# Altium PCB DB30.PcbDoc (part 5 of 8)
Units mil, origin at the board's own origin, x right, y up, seen from the top; angles counter-clockwise.
Board outline 3236.22 x 4456.69 mil, 8 copper layers (Top Layer, MidLayer1, MidLayer2, GND-Layer5, MidLayer3, VCC, MidLayer4, Bottom Layer), stack 61.8 mil thick; 219 components, 472 nets, 1811 pads, 1561 vias.
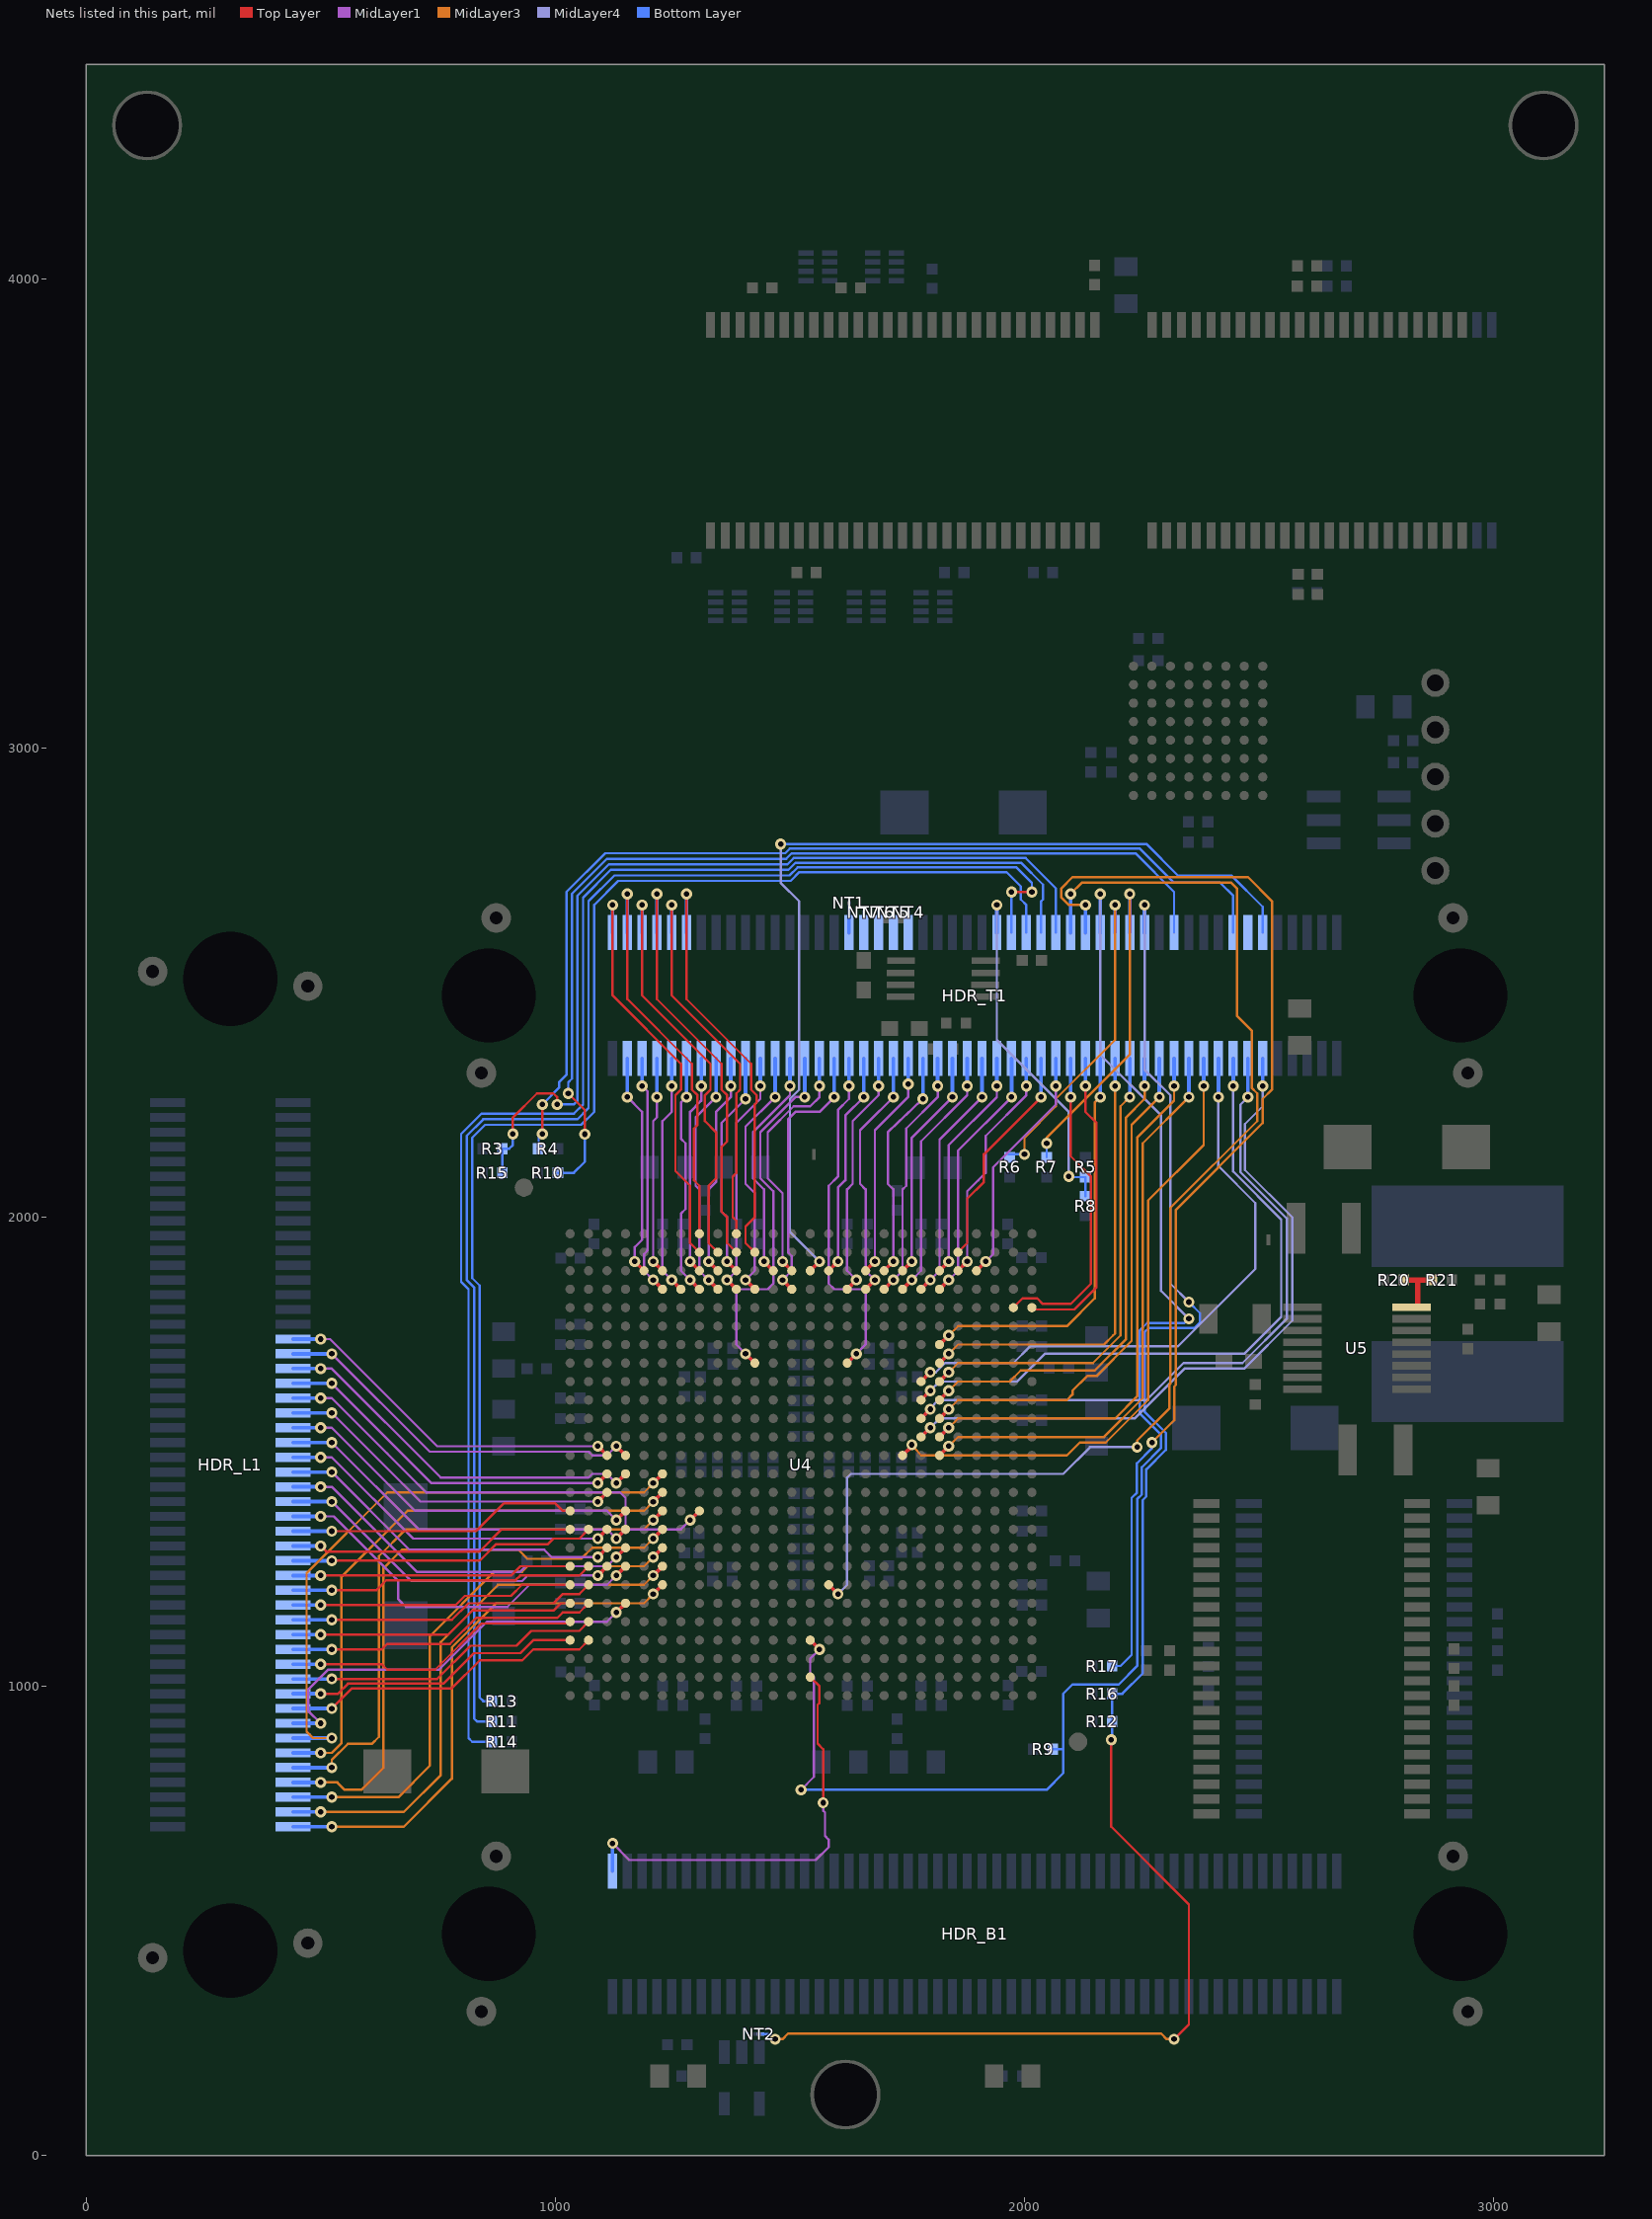
[diagram p11: the nets of this part, all layers, seen from the top]

## Via types
v1: diameter 23.62, hole 11.81, Top Layer to Bottom Layer, 944 vias
v2: diameter 23.62, hole 11.81, Top Layer to Bottom Layer, tented both sides, 477 vias
v3: diameter 27.56, hole 15.75, Top Layer to Bottom Layer, 139 vias
v4: diameter 23.62, hole 11.81, Top Layer to Bottom Layer, tented top, 1 vias

## Nets (pads, with @x,y where several pads share a name; then routed paths per layer and width w, separated by ;. In a path a pad name is that pad's centre, name@x,y a point inside that pad or via, vN(x,y) a via of type N, cw(c..) or ccw(c..) an arc to the next point about the centre after c; other vN are vias at no path point) (continued)
EXTEND_B16: HDR_L1.34 U4.N3 | length 772
  Top Layer w7.87: v1(1090.55,1511.81) U4.N3@1110.24,1492.13
  MidLayer1 w5: v2(500,1740.16) 519.68,1740.16 748.03,1511.81 956.69,1511.81 968.5,1511.81 v1(1090.55,1511.81)
  Bottom Layer w7.87: HDR_L1.34@440.94,1740.15 v2(500,1740.16)
EXTEND_B17: HDR_L1.36 U4.N4 | length 814.7
  Top Layer w7.87: v1(1129.92,1511.81) U4.N4@1149.61,1492.13
  MidLayer1 w5: v2(523.62,1708.66) 732.29,1500 956.69,1500 968.5,1500 1070.87,1500 1078.74,1492.13 1110.23,1492.13 v1(1129.92,1511.81)
  Bottom Layer w7.87: HDR_L1.36@440.94,1708.66 v2(523.62,1708.66)
EXTEND_B18: HDR_L1.38 U4.P4 | length 824.4
  Top Layer w7.87: v1(1129.92,1433.07) U4.P4@1149.61,1452.76
  MidLayer1 w5: v2(500,1677.17) 523.62,1677.17 755.91,1444.88 956.69,1444.88 968.5,1444.88 1070.87,1444.88 1078.74,1452.76 1110.23,1452.76 v1(1129.92,1433.07)
  Bottom Layer w7.87: HDR_L1.38@440.94,1677.16 v2(500,1677.17)
EXTEND_B19: HDR_L1.40 U4.P3 | length 765.5
  Top Layer w7.87: v1(1090.55,1433.07) U4.P3@1110.24,1452.76
  MidLayer1 w5: v2(523.62,1645.67) 736.22,1433.07 956.69,1433.07 968.5,1433.07 v1(1090.55,1433.07)
  Bottom Layer w7.87: HDR_L1.40@440.94,1645.67 v2(523.62,1645.67)
EXTEND_B20: HDR_L1.42 U4.T8 | length 1032.8
  Top Layer w7.87: v1(1287.4,1354.33) U4.T8@1307.09,1374.02
  MidLayer1 w5: v2(500,1614.17) 523.62,1614.17 641.73,1496.06 724.41,1413.39 956.69,1413.39 968.5,1413.39 1003.94,1413.39 1137.8,1413.39 1149.61,1401.57 1149.61,1342.52 1157.48,1334.65 1267.72,1334.65 v1(1287.4,1354.33)
  Bottom Layer w7.87: HDR_L1.42@440.94,1614.17 v2(500,1614.17)
EXTEND_B21: HDR_L1.44 U4.R3 | length 755.7
  Top Layer w7.87: v1(1090.55,1393.7) U4.R3@1110.24,1413.39
  MidLayer1 w5: v2(523.62,1582.68) 712.6,1393.7 956.69,1393.7 968.5,1393.7 v1(1090.55,1393.7)
  Bottom Layer w7.87: HDR_L1.44@440.94,1582.67 v2(523.62,1582.68)
EXTEND_B22: HDR_L1.46 U4.T4 | length 798.4
  Top Layer w7.87: v1(1129.92,1354.33) U4.T4@1149.61,1374.02
  MidLayer1 w5: v2(500,1551.18) 523.62,1551.18 700.79,1374.02 956.69,1374.02 968.5,1374.01 1110.24,1374.01 v1(1129.92,1354.33)
  Bottom Layer w7.87: HDR_L1.46@440.94,1551.18 v2(500,1551.18)
EXTEND_B23: HDR_L1.48 U4.U4 | length 801.6
  Top Layer w7.87: v1(1129.92,1314.96) U4.U4@1149.61,1334.65
  MidLayer1 w5: v2(523.62,1519.68) 708.66,1334.65 956.69,1334.65 968.5,1334.65 996.06,1334.65 1110.24,1334.64 v1(1129.92,1314.96)
  Bottom Layer w7.87: HDR_L1.48@440.94,1519.68 v2(523.62,1519.68)
EXTEND_B24: HDR_L1.50 U4.U3 | length 749.2
  Top Layer w7.87: v1(1090.55,1314.96) U4.U3@1110.24,1334.65
  MidLayer1 w5: v2(500,1488.19) 523.62,1488.19 696.85,1314.96 956.69,1314.96 968.5,1314.96 996.06,1314.96 v1(1090.55,1314.96)
  Bottom Layer w7.87: HDR_L1.50@440.94,1488.19 v2(500,1488.19)
EXTEND_B25: HDR_L1.52 U4.V3 | length 752.5
  Top Layer w7.87: v1(1090.55,1275.59) U4.V3@1110.24,1295.28
  MidLayer1 w5: v2(523.62,1456.69) 688.98,1291.34 956.69,1291.34 968.5,1291.34 976.38,1291.34 992.13,1275.59 v1(1090.55,1275.59)
  Bottom Layer w7.87: HDR_L1.52@440.94,1456.69 v2(523.62,1456.69)
EXTEND_B26: HDR_L1.54 U4.V4 | length 804.9
  Top Layer w7.87: v1(1129.92,1275.59) U4.V4@1149.61,1295.28
  MidLayer1 w5: v2(500,1425.2) 523.62,1425.2 704.72,1244.09 925.2,1244.09 937.01,1255.91 956.69,1255.91 968.5,1255.91 1110.24,1255.91 v1(1129.92,1275.59)
  Bottom Layer w7.87: HDR_L1.54@440.94,1425.19 v2(500,1425.2)
EXTEND_B27: HDR_L1.56 U4.W3 | length 752.5
  Top Layer w7.87: v1(1090.55,1236.22) U4.W3@1110.24,1255.91
  MidLayer1 w5: v2(523.62,1393.7) 692.91,1224.41 929.13,1224.41 940.94,1236.22 956.69,1236.22 968.5,1236.22 v1(1090.55,1236.22)
  Bottom Layer w7.87: HDR_L1.56@440.94,1393.7 v2(523.62,1393.7)
EXTEND_B28: HDR_L1.58 U4.W4 | length 961.4
  Top Layer w7.87: v1(1129.92,1236.22) U4.W4@1149.61,1255.91
  MidLayer1 w5: v2(500,1362.21) 527.56,1362.21 665.3,1224.46 665.3,1185.7 681.8,1169.2 897.55,1169.2 944.88,1216.54 956.69,1216.54 968.5,1216.54 1110.24,1216.54 ; 996.06,1216.54 1110.24,1216.54 ; v1(1129.92,1236.22) 1110.24,1216.54
  Bottom Layer w7.87: HDR_L1.58@440.94,1362.2 v2(500,1362.21)
EXTEND_B29: HDR_L1.60 U4.T1 | length 621.5
  Top Layer w5: v2(523.62,1330.71) 830.71,1330.71 889.76,1389.76 956.69,1389.76 968.5,1389.76 1000,1389.76 1015.75,1374.02 U4.T1@1031.5,1374.02
  Bottom Layer w7.87: HDR_L1.60@440.94,1330.71 v2(523.62,1330.71)
EXTEND_B30: HDR_L1.62 U4.U1 | length 615
  Top Layer w5: v2(500,1299.21) 511.81,1287.4 838.58,1287.4 885.83,1334.65 956.69,1334.65 968.5,1334.65 U4.U1@1031.5,1334.65
  Bottom Layer w7.87: HDR_L1.62@440.94,1299.21 v2(500,1299.21)
EXTEND_B31: HDR_L1.64 U4.U2 | length 657.6
  Top Layer w5: v2(523.62,1267.72) 838.58,1267.72 874.02,1303.15 956.69,1303.15 968.5,1303.15 984.25,1303.15 996.06,1314.96 1051.18,1314.96 U4.U2@1070.87,1334.65
  Bottom Layer w7.87: HDR_L1.64@440.94,1267.71 v2(523.62,1267.72)
EXTEND_B32: HDR_L1.66 U4.W1 | length 598.7
  Top Layer w5: v2(500,1236.22) 905.51,1236.22 925.2,1255.91 952.76,1255.91 968.5,1255.91 U4.W1@1031.5,1255.91
  Bottom Layer w7.87: HDR_L1.66@440.94,1236.22 v2(500,1236.22)
EXTEND_B33: HDR_L1.68 U4.W2 | length 651.1
  Top Layer w5: v2(523.62,1204.72) 618.4,1204.72 639.9,1226.22 915.2,1226.22 925.2,1236.22 952.76,1236.22 968.5,1236.22 1051.18,1236.22 U4.W2@1070.87,1255.91
  Bottom Layer w7.87: HDR_L1.68@440.94,1204.72 v2(523.62,1204.72)
EXTEND_B34: HDR_L1.70 U4.Y1 | length 608.5
  Top Layer w5: v2(500,1173.23) 787.4,1173.23 807.09,1192.91 905.51,1192.91 929.13,1216.54 952.76,1216.54 968.5,1216.54 U4.Y1@1031.5,1216.54
  Bottom Layer w7.87: HDR_L1.70@440.94,1173.23 v2(500,1173.23)
EXTEND_B35: HDR_L1.72 U4.Y2 | length 660.9
  Top Layer w5: v2(523.62,1141.73) 779.53,1141.73 814.96,1177.17 952.76,1177.17 968.5,1177.17 996.06,1177.17 1015.75,1196.85 1051.18,1196.85 U4.Y2@1070.87,1216.54
  Bottom Layer w7.87: HDR_L1.72@440.94,1141.73 v2(523.62,1141.73)
EXTEND_B36: HDR_L1.74 U4.AA1 | length 618.3
  Top Layer w5: v2(500,1110.24) 771.65,1110.24 822.83,1161.42 952.76,1161.42 968.5,1161.42 996.06,1161.42 1011.81,1177.17 U4.AA1@1031.5,1177.17
  Bottom Layer w7.87: HDR_L1.74@440.94,1110.23 v2(500,1110.24)
EXTEND_B37: HDR_L1.76 U4.AA2 | length 670.7
  Top Layer w5: v2(523.62,1078.74) 629.92,1078.74 641.73,1090.55 775.59,1090.55 830.71,1145.67 952.76,1145.67 968.5,1145.67 1003.94,1145.67 1015.75,1157.48 1051.18,1157.48 U4.AA2@1070.87,1177.17
  Bottom Layer w7.87: HDR_L1.76@440.94,1078.74 v2(523.62,1078.74)
EXTEND_B38: HDR_L1.78 U4.AB1 | length 637.8
  Top Layer w5: v2(500,1047.25) 629.92,1047.25 641.73,1035.43 744.09,1035.43 842.52,1133.86 952.76,1133.86 968.5,1133.86 1027.56,1133.86 U4.AB1@1031.5,1137.8
  Bottom Layer w7.87: HDR_L1.78@440.94,1047.24 v2(500,1047.25)
EXTEND_B39: HDR_L1.80 U4.AB2 | length 680.5
  Top Layer w5: v2(523.62,1015.75) 748.03,1015.75 818.9,1086.61 917.32,1086.61 948.82,1118.11 952.76,1118.11 968.5,1118.11 1011.81,1118.11 1051.18,1118.11 U4.AB2@1070.87,1137.8
  Bottom Layer w7.87: HDR_L1.80@440.94,1015.74 v2(523.62,1015.75)
EXTEND_B40: HDR_L1.82 U4.AC1 | length 637.8
  Top Layer w5: v2(500,984.25) 536.6,984.25 558.1,1005.75 761.65,1005.75 826.77,1070.87 925.2,1070.87 952.76,1098.43 968.5,1098.42 1011.81,1098.42 U4.AC1@1031.5,1098.43
  Bottom Layer w7.87: HDR_L1.82@440.94,984.25 v2(500,984.25)
EXTEND_B41: HDR_L1.84 U4.AC2 | length 690.3
  Top Layer w5: v2(523.62,952.75) 566.62,995.75 779.21,995.75 838.58,1055.12 929.13,1055.12 952.76,1078.74 968.5,1078.74 1051.18,1078.74 U4.AC2@1070.87,1098.43
  Bottom Layer w7.87: HDR_L1.84@440.94,952.75 v2(523.62,952.75)
EXTEND_B42: HDR_L1.86 U4.AA4 | length 894.4
  Top Layer w7.87: v1(1129.92,1157.48) U4.AA4@1149.61,1177.17
  MidLayer1 w5: v2(500,921.26) 473.3,947.96 473.3,992.9 516.16,1035.76 639.36,1035.76 752.29,1035.76 854.33,1137.8 952.76,1137.8 968.5,1137.8 1110.24,1137.8 v1(1129.92,1157.48)
  Bottom Layer w7.87: HDR_L1.86@440.94,921.26 v2(500,921.26)
EXTEND_B43: HDR_L1.88 U4.P6 | length 1326.2
  Top Layer w7.87: v1(1208.66,1433.07) U4.P6@1228.35,1452.76
  MidLayer3 w5: v2(523.62,889.76) 483.44,889.76 469.9,903.3 469.9,1241.5 641.79,1413.39 956.69,1413.39 968.5,1413.39 1188.98,1413.39 v1(1208.66,1433.07)
  Bottom Layer w7.87: HDR_L1.88@440.94,889.76 v2(523.62,889.76)
EXTEND_B44: HDR_L1.90 U4.R6 | length 1224.9
  Top Layer w7.87: v1(1208.66,1393.7) U4.R6@1228.35,1413.39
  MidLayer3 w5: v2(500,858.27) 523.62,858.27 543.8,878.45 543.8,1232.78 685.04,1374.02 956.69,1374.02 968.5,1374.02 1039.37,1374.02 1188.98,1374.02 v1(1208.66,1393.7)
  Bottom Layer w7.87: HDR_L1.90@440.94,858.26 v2(500,858.27)
EXTEND_B45: HDR_L1.92 U4.T6 | length 1249.2
  Top Layer w7.87: v1(1208.66,1354.33) U4.T6@1228.35,1374.02
  MidLayer3 w5: v2(523.62,826.77) 523.62,843.22 557.8,877.4 608.76,877.4 623.86,892.5 623.86,1277.4 681.1,1334.65 956.69,1334.65 968.5,1334.65 1188.98,1334.65 v1(1208.66,1354.33)
  Bottom Layer w7.87: HDR_L1.92@440.94,826.77 v2(523.62,826.77)
EXTEND_B46: HDR_L1.94 U4.U6 | length 1289.2
  Top Layer w7.87: v1(1208.66,1314.96) U4.U6@1228.35,1334.65
  MidLayer3 w5: v2(500,795.28) 535.43,795.28 551.18,779.53 586.61,779.53 633.86,826.77 633.86,1251.97 673.23,1291.34 921.26,1291.34 940.94,1271.65 956.69,1271.65 968.5,1271.65 1055.12,1271.65 1078.74,1295.28 1188.98,1295.28 v1(1208.66,1314.96)
  Bottom Layer w7.87: HDR_L1.94@440.94,795.27 v2(500,795.28)
EXTEND_B47: HDR_L1.96 U4.V6 | length 1169
  Top Layer w7.87: v1(1208.66,1275.59) U4.V6@1228.35,1295.28
  MidLayer3 w5: v2(523.62,763.78) 665.35,763.78 732.28,830.71 732.28,1106.3 870.08,1244.09 929.13,1244.09 940.94,1255.91 956.69,1255.91 968.5,1255.91 1188.97,1255.9 v1(1208.66,1275.59)
  Bottom Layer w7.87: HDR_L1.96@440.95,763.78 v2(523.62,763.78)
EXTEND_B48: HDR_L1.98 U4.W6 | length 1170.3
  Top Layer w7.87: v1(1208.66,1236.22) U4.W6@1228.35,1255.91
  MidLayer3 w5: v2(500,732.28) 677.16,732.28 755.91,811.02 755.91,1094.49 877.95,1216.54 956.69,1216.54 968.5,1216.54 1188.97,1216.53 v1(1208.66,1236.22)
  Bottom Layer w7.87: HDR_L1.98@440.94,732.28 v2(500,732.28)
EXTEND_B49: HDR_L1.100 U4.Y6 | length 1164.8
  Top Layer w7.87: v1(1208.66,1196.85) U4.Y6@1228.35,1216.54
  MidLayer3 w5: v2(523.62,700.79) 677.16,700.79 779.53,803.15 779.53,1082.68 874.02,1177.17 956.69,1177.17 968.5,1177.17 1188.97,1177.16 v1(1208.66,1196.85)
  Bottom Layer w7.87: HDR_L1.100@440.94,700.78 v2(523.62,700.79)
EXTEND_C0: HDR_T1.89 U4.M20 | length 1569.7
  Top Layer w7.87: U4.M20@1779.53,1531.5 v1(1799.21,1551.18)
  MidLayer4 w5: v1(1799.21,1551.18) 1818.9,1570.87 1988.19,1570.87 2078.74,1570.87 2094.49,1570.87 2234.77,1570.87 2341.07,1677.17 2468.5,1677.17 2570.87,1779.53 2570.87,1999.66 2470,2100.53 2470,2198.35 2507.87,2236.22 v2(2507.87,2279.53)
  Bottom Layer w7.87: v2(2507.87,2279.53) HDR_T1.89@2507.88,2338.58 v2(2507.87,2279.53)
EXTEND_C1: HDR_T1.87 U4.L20 | length 1471.8
  Top Layer w7.87: U4.L20@1779.53,1570.87 v1(1799.21,1590.55)
  MidLayer4 w5: v1(1799.21,1590.55) 1814.96,1610.24 1968.5,1610.24 2078.74,1610.24 2094.49,1610.24 2260,1610.24 2338.74,1688.98 2464.57,1688.98 2559.06,1783.46 2559.06,1997.33 2460,2096.39 2460,2239.53 v2(2476.38,2255.9)
  Bottom Layer w7.87: v2(2476.38,2255.9) HDR_T1.87@2476.38,2338.58
EXTEND_C2: HDR_T1.85 U4.K20 | length 1434.7
  Top Layer w7.87: U4.K20@1779.53,1610.24 v1(1799.21,1629.92)
  MidLayer4 w5: v1(1799.21,1629.92) 1818.9,1649.61 1984.25,1649.61 2043.31,1708.66 2074.8,1708.66 2090.55,1708.66 2468.5,1708.66 2547.24,1787.4 2547.24,1995 2444.88,2097.37 v2(2444.88,2279.53)
  Bottom Layer w7.87: v2(2444.88,2279.53) HDR_T1.85@2444.88,2338.58
EXTEND_C3: HDR_T1.83 U4.J20 | length 1293.5
  Top Layer w7.87: U4.J20@1779.53,1649.61 v1(1799.21,1669.29)
  MidLayer4 w5: v1(1799.21,1669.29) 1811.21,1669.29 1830.9,1688.98 1976.38,1688.98 2011.81,1724.41 2074.8,1724.41 2090.55,1724.41 2326.77,1724.41 2492.13,1889.76 2492.13,2030 2413.38,2108.74 v2(2413.38,2255.9)
  Bottom Layer w7.87: v2(2413.38,2255.9) HDR_T1.83@2413.39,2338.58
EXTEND_C4: HDR_T1.81 U4.N19 | length 1368.3
  Top Layer w7.87: U4.N19@1740.16,1492.13 v1@1759.84,1511.81
  MidLayer3 w5: v1(1759.84,1514.76) 1779.53,1492.13 2078.74,1492.13 2090.55,1492.13 2118.11,1519.69 2173.23,1519.69 2263.78,1610.24 2263.78,2035.43 2381.89,2153.54 v2(2381.89,2279.53)
  Bottom Layer w7.87: v2(2381.89,2279.53) HDR_T1.81@2381.89,2338.58
EXTEND_C5: HDR_T1.79 U4.N21 | length 1248.8
  Top Layer w7.87: U4.N21@1818.9,1492.13 v1(1838.58,1511.81)
  MidLayer3 w5: v1(1838.58,1511.81) 1858.27,1531.5 2078.74,1531.5 2090.55,1531.5 2169.29,1531.5 2251.97,1614.17 2251.97,2157.48 v2(2350.39,2255.9)
  Bottom Layer w7.87: v2(2350.39,2255.9) HDR_T1.79@2350.4,2338.58
EXTEND_C6: HDR_T1.77 U4.M21 | length 1210.2
  Top Layer w7.87: U4.M21@1818.9,1531.5 v1(1838.58,1551.18)
  MidLayer3 w5: v1(1838.58,1551.18) 1858.27,1570.87 2007.87,1570.87 2078.74,1570.87 2090.55,1570.87 2192.91,1570.87 2240.16,1618.11 2240.16,2169.29 2318.89,2248.03 v2(2318.89,2279.53)
  Bottom Layer w7.87: v2(2318.89,2279.53) HDR_T1.77@2318.9,2338.58
EXTEND_C7: HDR_T1.75 U4.L21 | length 1109.4
  Top Layer w7.87: U4.L21@1818.9,1570.87 v1(1838.58,1590.55)
  MidLayer3 w5: v1(1838.58,1590.55) 1858.27,1610.24 2078.74,1610.24 2090.55,1610.24 2102.36,1622.05 2102.36,1629.92 2133.86,1661.42 2153.54,1661.42 2228.35,1736.22 2228.35,2196.85 v2(2287.4,2255.9)
  Bottom Layer w7.87: v2(2287.4,2255.9) HDR_T1.75@2287.4,2338.58
EXTEND_C8: HDR_T1.73 U4.K21 | length 1066.2
  Top Layer w7.87: U4.K21@1818.9,1610.24 v1(1838.58,1629.92)
  MidLayer3 w5: v1(1838.58,1629.92) 1858.27,1649.61 1968.5,1649.61 1992.13,1673.23 2078.74,1673.23 2090.55,1673.23 2149.61,1673.23 2216.54,1740.16 2216.54,2212.6 2255.9,2251.97 v2(2255.9,2279.53)
  Bottom Layer w7.87: v2(2255.9,2279.53) HDR_T1.73@2255.91,2338.58
EXTEND_C9: HDR_T1.71 U4.J21 | length 1025.3
  Top Layer w7.87: U4.J21@1818.9,1649.61 v1(1838.58,1669.29)
  MidLayer3 w5: v1(1838.58,1669.29) 1858.27,1688.98 2078.74,1688.98 2090.55,1688.98 2145.67,1688.98 2204.72,1748.03 2204.72,2236.22 v2(2224.41,2255.9)
  Bottom Layer w7.87: v2(2224.41,2255.9) HDR_T1.71@2224.41,2338.58
EXTEND_C10: HDR_T1.69 U4.H21 | length 986.7
  Top Layer w7.87: U4.H21@1818.9,1688.98 v1(1838.58,1708.66)
  MidLayer3 w5: v1(1838.58,1708.66) 1858.27,1728.35 2078.74,1728.35 2090.55,1728.35 2169.29,1728.35 2188.98,1748.03 2192.91,1751.97 v2(2192.91,2279.53)
  Bottom Layer w7.87: v2(2192.91,2279.53) HDR_T1.69@2192.91,2338.58
EXTEND_C11: HDR_T1.67 U4.G21 | length 888.2
  Top Layer w7.87: U4.G21@1818.9,1728.35 v1(1838.58,1748.03)
  MidLayer3 w5: v1(1838.58,1748.03) 1858.27,1767.72 2078.74,1767.72 2090.55,1767.72 2149.61,1826.77 2149.61,2244.1 v2(2161.42,2255.9)
  Bottom Layer w7.87: v2(2161.42,2255.9) HDR_T1.67@2161.42,2338.58
EXTEND_C12: HDR_T1.65 U4.E26 | length 657
  Top Layer w5: U4.E26@2015.75,1807.09 2019.69,1803.15 2078.74,1803.15 2090.55,1803.15 2106.3,1803.15 2153.54,1850.39 2153.54,2200.79 2129.92,2224.41 v2(2129.92,2279.53)
  Bottom Layer w7.87: v2(2129.92,2279.53) HDR_T1.65@2129.92,2338.58
EXTEND_C13: HDR_T1.63 U4.E25 | length 694.6
  Top Layer w5: U4.E25@1976.38,1807.09 1996.06,1826.77 2016.73,1826.77 2027.07,1826.77 2038.88,1814.96 2078.74,1814.96 2090.55,1814.96 2098.43,1814.96 2141.73,1858.27 2141.73,2086.61 2098.42,2129.92 v2(2098.42,2255.9)
  Bottom Layer w7.87: v2(2098.42,2255.9) HDR_T1.63@2098.43,2338.58
EXTEND_C14: HDR_T1.61 U4.C23 | length 522.9
  Top Layer w7.87: U4.C23@1897.64,1885.83 v1(1917.32,1905.51)
  MidLayer1 w5: v1(1917.32,1905.51) 1933.07,1921.26 1933.07,2027.56 1933.07,2039.37 1933.07,2106.3 2066.93,2240.16 v2(2066.93,2279.53)
  Bottom Layer w7.87: v2(2066.93,2279.53) HDR_T1.61@2066.93,2338.58
EXTEND_C15: HDR_T1.59 U4.B22 | length 486.8
  Top Layer w5: U4.B22@1858.27,1925.2 1877.95,1944.88 1877.95,2027.56 1877.95,2039.37 1913.39,2074.8 1913.39,2133.86 v2(2035.43,2255.9)
  Bottom Layer w7.87: v2(2035.43,2255.9) HDR_T1.59@2035.43,2338.58
EXTEND_C16: HDR_T1.57 U4.C22 | length 513.1
  Top Layer w7.87: U4.C22@1858.27,1885.83 v1(1877.95,1905.51)
  MidLayer1 w5: v1(1877.95,1905.51) 1877.95,2027.56 1877.95,2039.37 1877.95,2055.12 1901.57,2078.74 1917.32,2094.49 1917.32,2173.23 2003.94,2259.84 v2(2003.93,2279.53)
  Bottom Layer w7.87: v2(2003.93,2279.53) HDR_T1.57@2003.94,2338.58
EXTEND_C17: HDR_T1.55 U4.D21 | length 555.7
  Top Layer w7.87: U4.D21@1818.9,1846.46 v1(1838.58,1866.14)
  MidLayer1 w5: v1(1838.58,1866.14) 1858.27,1885.83 1858.27,2027.56 1858.27,2039.37 1858.27,2141.73 v2(1972.44,2255.9)
  Bottom Layer w7.87: v2(1972.44,2255.9) HDR_T1.55@1972.44,2338.58
EXTEND_C18: HDR_T1.53 U4.C21 | length 503.3
  Top Layer w7.87: U4.C21@1818.9,1885.83 v1(1838.58,1905.51)
  MidLayer1 w5: v1(1838.58,1905.51) 1838.58,2027.56 1838.58,2039.37 1838.58,2153.54 1940.94,2255.9 v2(1940.94,2279.53)
  Bottom Layer w7.87: v2(1940.94,2279.53) HDR_T1.53@1940.95,2338.58
EXTEND_C19: HDR_T1.51 U4.D20 | length 545.9
  Top Layer w7.87: U4.D20@1779.53,1846.46 v1(1799.21,1866.14)
  MidLayer1 w5: v1(1799.21,1866.14) 1818.9,1885.83 1818.9,2027.56 1818.9,2039.37 1818.9,2165.36 v2(1909.45,2255.9)
  Bottom Layer w7.87: v2(1909.45,2255.9) HDR_T1.51@1909.45,2338.58
EXTEND_C20: HDR_T1.49 U4.D19 | length 663.4
  Top Layer w7.87: U4.D19@1740.16,1846.46 v1(1759.84,1866.14)
  MidLayer1 w5: v1(1759.84,1866.14) 1779.53,1885.83 ; 1779.53,2000 1779.53,1885.83 ; v2(1877.95,2279.53) 1877.95,2259.84 1779.53,2161.42 1779.53,2039.37 1779.53,2027.56 1779.53,1885.83
  Bottom Layer w7.87: v2(1877.95,2279.53) HDR_T1.49@1877.95,2338.58
EXTEND_C21: HDR_T1.47 U4.C19 | length 496.8
  Top Layer w7.87: U4.C19@1740.16,1885.83 v1(1759.84,1905.51)
  MidLayer1 w5: v1(1759.84,1905.51) 1759.84,2027.56 1759.84,2039.37 1759.84,2169.29 v2(1846.46,2255.9)
  Bottom Layer w7.87: v2(1846.46,2255.9) HDR_T1.47@1846.46,2338.58
EXTEND_C22: HDR_T1.45 U4.D18 | length 539.4
  Top Layer w7.87: U4.D18@1700.79,1846.46 v1(1720.47,1866.14)
  MidLayer1 w5: v1(1720.47,1866.14) 1740.16,1885.83 1740.16,2027.56 1740.16,2039.37 1740.16,2059.05 1748.03,2066.93 1748.03,2188.97 1814.96,2255.9 v2(1814.96,2279.53)
  Bottom Layer w7.87: v2(1814.96,2279.53) HDR_T1.45@1814.96,2338.58
EXTEND_C23: HDR_T1.43 U4.C18 | length 498
  Top Layer w7.87: U4.C18@1700.79,1885.83 v1(1720.47,1905.51)
  MidLayer1 w5: v1(1720.47,1905.51) 1720.47,2027.56 1720.47,2039.37 1720.47,2059.06 1708.66,2070.87 1708.66,2181.1 v2(1783.46,2251.96)
  Bottom Layer w7.87: v2(1783.46,2251.96) HDR_T1.43@1783.47,2338.58
EXTEND_C24: HDR_T1.41 U4.C17 | length 490.3
  Top Layer w7.87: U4.C17@1661.42,1885.83 v1(1681.1,1905.51)
  MidLayer1 w5: v1(1681.1,1905.51) 1681.1,2000 1681.1,2027.56 1681.1,2039.37 1681.1,2185.04 1751.97,2255.9 v2@1751.97,2279.53
  Bottom Layer w7.87: v2@1751.97,2279.53 HDR_T1.41@1751.97,2338.58
  other v2: 1751.97,2283.46
EXTEND_C25: HDR_T1.39 U4.D17 | length 620.6
  Top Layer w7.87: U4.D17@1661.42,1846.46 v1(1681.1,1866.14)
  MidLayer1 w5: 1665.35,2200.79 v2(1720.47,2255.9) 1649.61,2185.04 1649.61,2070.87 1661.42,2059.06 1661.42,2039.37 1661.42,2027.56 1661.42,1885.83 v1(1681.1,1866.14)
  Bottom Layer w7.87: v2(1720.47,2255.9) HDR_T1.39@1720.47,2338.58
EXTEND_C26: HDR_T1.37 U4.D16 | length 536.2
  Top Layer w7.87: U4.D16@1622.05,1846.46 v1(1641.73,1866.14)
  MidLayer1 w5: v1(1641.73,1866.14) 1622.05,1885.83 1622.05,2027.56 1622.05,2039.37 1622.05,2059.06 1633.86,2070.87 1633.86,2204.72 1688.98,2259.84 v2(1688.97,2279.53)
  Bottom Layer w7.87: v2(1688.97,2279.53) HDR_T1.37@1688.98,2338.58
EXTEND_C27: HDR_T1.35 U4.C15 | length 483.7
  Top Layer w7.87: U4.C15@1582.68,1885.83 v1(1602.36,1905.51)
  MidLayer1 w5: v1(1602.36,1905.51) 1602.36,2027.56 1602.36,2039.37 1602.36,2062.99 1618.11,2078.74 1618.11,2216.53 v2(1657.48,2255.9)
  Bottom Layer w7.87: v2(1657.48,2255.9) HDR_T1.35@1657.48,2338.58
EXTEND_C28: HDR_T1.33 U4.H16 | length 751.1
  Top Layer w7.87: U4.H16@1622.05,1688.98 v1(1641.73,1708.66)
  MidLayer1 w5: v2(1625.98,2279.53) 1625.98,2251.97 1602.36,2228.35 1602.36,2086.61 1582.68,2066.93 1582.68,2039.37 1582.68,2027.56 1582.68,1992.13 1582.68,1858.27 1594.49,1846.46 1653.54,1846.46 1661.42,1838.58 1661.42,1728.35 v1(1641.73,1708.66)
  Bottom Layer w7.87: v2(1625.98,2279.53) HDR_T1.33@1625.99,2338.58
EXTEND_C29: HDR_T1.31 U4.D13 | length 582.4
  Top Layer w7.87: v1(1484.25,1866.14) U4.D13@1503.94,1846.46
  MidLayer1 w5: v1(1484.25,1866.14) 1503.94,1885.83 1503.94,1917.32 1496.06,1925.2 1496.06,2027.56 1496.06,2039.37 1496.06,2208.66 1511.81,2224.41 1562.99,2224.41 v2(1594.49,2255.9)
  Bottom Layer w7.87: v2(1594.49,2255.9) HDR_T1.31@1594.49,2338.58
EXTEND_C30: HDR_T1.29 U4.C13 | length 540.4
  Top Layer w7.87: v1(1484.25,1905.51) U4.C13@1503.94,1885.83
  MidLayer1 w5: v1(1484.25,1905.51) 1484.25,2027.56 1484.25,2039.37 1484.25,2051.18 1452.76,2082.68 1452.76,2181.1 1507.87,2236.22 1543.31,2236.22 1562.99,2255.9 v2(1562.99,2279.53)
  Bottom Layer w7.87: v2(1562.99,2279.53) HDR_T1.29@1562.99,2338.58
EXTEND_C31: HDR_T1.27 U4.H11 | length 795.2
  Top Layer w7.87: v1(1405.51,1708.66) U4.H11@1425.2,1688.98
  MidLayer1 w5: v1(1405.51,1708.66) 1385.83,1728.35 1385.83,1838.58 1393.7,1846.46 1452.76,1846.46 1464.57,1858.27 1464.57,1992.13 1464.57,2027.56 1464.57,2039.37 1464.57,2055.12 1437.01,2082.68 1437.01,2181.1 1511.81,2255.9 v2(1531.5,2255.9)
  Bottom Layer w7.87: v2(1531.5,2255.9) HDR_T1.27@1531.5,2338.58
EXTEND_C32: HDR_T1.25 U4.C12 | length 503.3
  Top Layer w7.87: v1(1444.88,1905.51) U4.C12@1464.57,1885.83
  MidLayer1 w5: v1(1444.88,1905.51) 1444.88,2027.56 1444.88,2039.37 1444.88,2059.06 1421.26,2082.68 1421.26,2181.1 1500,2259.84 v2(1500,2279.53)
  Bottom Layer w7.87: v2(1500,2279.53) HDR_T1.25@1500,2338.58
EXTEND_C33: HDR_T1.23 U4.D11 | length 542.7
  Top Layer w7.87: v1(1405.51,1866.14) U4.D11@1425.2,1846.46
  MidLayer1 w5: v1(1405.51,1866.14) 1425.19,1885.83 1425.19,2027.56 1425.2,2039.37 1425.2,2051.18 1405.51,2070.87 1405.51,2192.91 v2(1468.5,2255.9)
  Bottom Layer w7.87: v2(1468.5,2255.9) HDR_T1.23@1468.5,2338.58
EXTEND_C34: HDR_T1.21 U4.D10 | length 529.6
  Top Layer w7.87: v1(1366.14,1866.14) U4.D10@1385.83,1846.46
  MidLayer1 w5: v1(1366.14,1866.14) 1385.82,1885.83 1385.82,2027.56 1385.83,2039.37 1385.83,2200.79 1437.01,2251.97 v2(1437.01,2279.53)
  Bottom Layer w7.87: v2(1437.01,2279.53) HDR_T1.21@1437.01,2338.58
EXTEND_C35: HDR_T1.19 U4.C10 | length 483.1
  Top Layer w7.87: v1(1366.14,1905.51) U4.C10@1385.83,1885.83
  MidLayer1 w5: v1(1366.14,1905.51) 1366.14,2000 1354.33,2011.81 1354.33,2027.56 1354.33,2039.37 1354.33,2200.79 v2(1405.51,2251.97)
  Bottom Layer w7.87: v2@1405.51,2255.9 HDR_T1.19@1405.51,2338.58
EXTEND_C36: HDR_T1.17 U4.C9 | length 480.5
  Top Layer w7.87: v1(1326.77,1905.51) U4.C9@1346.46,1885.83
  MidLayer1 w5: v1(1326.77,1905.51) 1326.77,2027.56 1326.77,2039.37 1326.77,2059.05 1342.52,2074.8 1342.52,2224.41 1374.02,2255.91 v2(1374.02,2279.53)
  Bottom Layer w7.87: v2(1374.02,2279.53) HDR_T1.17@1374.02,2338.58
EXTEND_C37: HDR_T1.15 U4.D9 | length 529.6
  Top Layer w7.87: v1(1326.77,1866.14) U4.D9@1346.46,1846.46
  MidLayer1 w5: v1(1326.77,1866.14) 1307.09,1885.83 1307.09,2027.56 1307.09,2039.37 1307.09,2059.06 1299.21,2066.93 1299.21,2212.6 v2(1342.52,2255.9)
  Bottom Layer w7.87: v2(1342.52,2255.9) HDR_T1.15@1342.52,2338.58
EXTEND_C38: HDR_T1.13 U4.C8 | length 470.7
  Top Layer w7.87: v1(1287.4,1905.51) U4.C8@1307.09,1885.83
  MidLayer1 w5: v1(1287.4,1905.51) 1287.4,2027.56 1287.4,2039.37 1287.4,2224.41 1311.02,2248.03 v2(1311.02,2279.53)
  Bottom Layer w7.87: v2(1311.02,2279.53) HDR_T1.13@1311.02,2338.58
EXTEND_C39: HDR_T1.11 U4.D8 | length 635.5
  Top Layer w7.87: v1(1287.4,1866.14) U4.D8@1307.09,1846.46
  MidLayer1 w5: 1267.72,2000 1267.72,1885.83 ; v2(1279.53,2255.9) 1267.72,2244.09 1267.72,2167 1277.4,2157.32 1277.4,2017.28 1267.72,2007.6 1267.72,1885.83 ; v1(1287.4,1866.14) 1267.72,1885.83
  Bottom Layer w7.87: v2(1279.53,2255.9) HDR_T1.11@1279.53,2338.58
EXTEND_C40: HDR_T1.12 U4.B11 | length 926.4
  Top Layer w5: v2(1279.53,2688.98) 1279.53,2464.57 1417.32,2326.77 1417.32,2271.65 1429.13,2259.84 1429.13,2244.09 1425.2,2240.16 1425.2,2039.37 1425.2,2027.56 1425.2,2000 1405.51,1980.32 1405.51,1944.88 U4.B11@1425.2,1925.2
  Bottom Layer w7.87: HDR_T1.12@1279.53,2606.3 v2(1279.53,2688.98)
EXTEND_C41: HDR_T1.9 U4.D7 | length 516.6
  Top Layer w7.87: v1(1248.03,1866.14) U4.D7@1267.72,1846.46
  MidLayer1 w5: v1(1248.03,1866.14) 1228.35,1885.83 1228.35,2027.56 1228.35,2039.37 1228.35,2204.72 1248.03,2224.41 v2(1248.03,2279.53)
  Bottom Layer w7.87: v2(1248.03,2279.53) HDR_T1.9@1248.03,2338.58
EXTEND_C42: HDR_T1.10 U4.A10 | length 830
  Top Layer w5: v2(1248.03,2665.35) 1248.03,2472.44 1393.7,2326.78 1393.7,2271.65 1385.83,2263.78 1385.83,2094.49 1377.95,2086.61 1377.95,2043.31 1377.95,2027.56 1377.95,2000 1385.83,1992.13 U4.A10@1385.83,1964.57
  Bottom Layer w7.87: HDR_T1.10@1248.03,2606.3 v2(1248.03,2665.35)
EXTEND_C43: HDR_T1.7 U4.C6 | length 464.2
  Top Layer w7.87: v1(1208.66,1905.51) U4.C6@1228.35,1885.83
  MidLayer1 w5: v1(1208.66,1905.51) 1208.66,2027.56 1208.66,2039.37 1208.66,2204.72 1216.54,2212.6 v2(1216.54,2255.9)
  Bottom Layer w7.87: v2(1216.54,2255.9) HDR_T1.7@1216.54,2338.58
EXTEND_C44: HDR_T1.8 U4.B10 | length 926.4
  Top Layer w5: v2(1216.54,2688.98) 1216.54,2464.57 1354.33,2326.77 1354.33,2271.65 1366.14,2259.84 1366.14,2161.42 1354.33,2149.61 1354.33,2043.31 1354.33,2027.56 1354.33,2011.81 1366.14,2000 1366.14,1944.88 U4.B10@1385.83,1925.2
  Bottom Layer w7.87: HDR_T1.8@1216.54,2606.3 v2(1216.54,2688.98)
EXTEND_C45: HDR_T1.5 U4.D6 | length 516.6
  Top Layer w7.87: v1(1208.66,1866.14) U4.D6@1228.35,1846.46
  MidLayer1 w5: v2(1185.04,2279.53) 1196.85,2267.72 1196.85,2039.37 1196.85,2027.56 1196.85,1929.13 1188.98,1921.26 1188.98,1885.83 v1(1208.66,1866.14)
  Bottom Layer w7.87: v2(1185.04,2279.53) HDR_T1.5@1185.04,2338.58
EXTEND_C46: HDR_T1.6 U4.B9 | length 948
  Top Layer w5: v2(1185.04,2665.35) 1185.04,2472.44 1330.71,2326.77 1330.71,2271.65 1318.9,2259.84 1318.9,2204.72 1342.52,2181.1 1342.52,2082.68 1326.77,2066.93 1326.77,2043.31 1326.77,2027.56 1326.77,1944.88 U4.B9@1346.46,1925.2
  Bottom Layer w7.87: HDR_T1.6@1185.04,2606.3 v2(1185.04,2665.35) HDR_T1.6@1185.04,2606.3
EXTEND_C47: HDR_T1.3 U4.C5 | length 480.5
  Top Layer w7.87: v1(1169.29,1905.51) U4.C5@1188.98,1885.83
  MidLayer1 w5: v2(1153.54,2255.9) 1185.04,2224.41 1185.04,2039.37 1185.04,2027.56 1185.04,1951.77 1169.29,1936.02 v1(1169.29,1905.51)
  Bottom Layer w7.87: v2(1153.54,2255.9) HDR_T1.3@1153.54,2338.58
EXTEND_C48: HDR_T1.4 U4.A8 | length 936.3
  Top Layer w5: v2(1153.54,2688.98) 1153.54,2464.57 1291.34,2326.77 1291.34,2271.65 1303.15,2259.84 1303.15,2196.85 1295.28,2188.98 1295.28,2078.74 1307.09,2066.93 1307.09,2043.31 1307.09,2027.56 U4.A8@1307.09,1964.57
  Bottom Layer w7.87: 1153.54,2665.35 HDR_T1.4@1153.54,2606.3 v2(1153.54,2688.98)
EXTEND_C49: HDR_T1.2 U4.B8 | length 885.6
  Top Layer w5: v2(1122.05,2665.35) 1122.05,2472.44 1267.72,2326.77 1267.72,2271.65 1255.91,2259.84 1255.91,2098.43 1287.4,2066.93 1287.4,2043.31 1287.4,2027.56 1287.4,1944.88 U4.B8@1307.09,1925.2
  Bottom Layer w7.87: HDR_T1.2@1122.05,2606.3 v2(1122.05,2665.35)
FB: R20.2 R21.1 U5.8 | length 120.2
  Top Layer w7.87: U5.8@2842.51,1807.09 U5.8@2842.51,1808.25
  Top Layer w11.81: R20.2@2808.58,1866.14 2838.58,1866.14 ; U5.8@2838.58,1807.09 2838.58,1808.25 2838.58,1866.14 ; R21.1@2868.58,1866.14 2838.58,1866.14
FPGA_CCLK: HDR_T1.66 R17.1 | length 2397.7
  MidLayer3 w5: v2(2129.92,2665.35) 2094.49,2665.35 2078.74,2681.1 2078.74,2700.79 2102.36,2724.41 2476.38,2724.41 2527.56,2673.23 2527.56,2271.65 2507.87,2251.97 2507.87,2200.79 2322.83,2015.75 2322.83,1642.67 2319.21,1639.05 2319.21,1567.24 v1(2271.65,1519.68)
  Bottom Layer w5: R17.1@2186.54,1043.31 2204.72,1043.31 2228.34,1066.92 2228.34,1401.57 2239.78,1413.01 2239.78,1475.21 2270.67,1506.1 v1@2270.67,1519.68
  Bottom Layer w7.87: HDR_T1.66@2129.92,2606.3 v2(2129.92,2665.35)
FPGA_CLK: HDR_B1.2 U4.AE14 | length 927.6
  Top Layer w5: U4.AE14@1543.31,1019.68 1562.99,1000 1562.99,964.57 1559.06,960.63 1559.06,877.95 1570.87,866.14 v1(1570.87,751.97)
  MidLayer1 w5: v2(1122.05,665.35) 1157.48,629.92 1555.12,629.92 1582.68,657.48 1582.68,673.23 1574.8,681.1 1574.8,731.31 1570.87,735.25 v1(1570.87,751.97)
  Bottom Layer w7.87: HDR_B1.2@1122.05,606.3 v2(1122.05,665.35)
FPGA_CLK1: HDR_T1.90 U4.C14 | length 2106.3
  Top Layer w7.87: U4.C14@1543.31,1885.83 v1(1562.99,1905.51)
  MidLayer4 w5: v1(1480.31,2795.28) 1480.31,2712.6 1519.68,2673.23 1519.68,2271.65 1500,2251.97 1500,1968.51 v1(1562.99,1905.51)
  Bottom Layer w5: v1(1480.31,2795.28) 2259.84,2795.28 2326.77,2728.35 2440.94,2728.35 2507.87,2661.42 HDR_T1.90@2507.88,2606.3
FPGA_DIN: HDR_T1.64 U4.Y15 | length 2695.6
  Top Layer w7.87: U4.Y15@1582.68,1216.54 v1(1602.36,1196.85)
  MidLayer3 w5: v2(2098.42,2688.98) 2122.05,2712.6 2440.94,2712.6 2452.76,2700.79 2452.76,2429.13 2484.25,2397.64 2484.25,2275.59 2496.06,2263.78 2496.06,2204.72 2311.02,2019.68 2311.02,1645 2309.21,1643.19 2309.21,1592.68 2240.16,1523.62 v1(2240.16,1509.84)
  MidLayer4 w5: v1(1602.36,1196.85) 1622.05,1216.54 1622.05,1444.88 1629.92,1452.76 2082.68,1452.76 2139.76,1509.84 v1(2240.16,1509.84)
  Bottom Layer w7.87: v2(2098.42,2688.98) HDR_T1.64@2098.43,2606.3
FPGA_DONE: HDR_T1.74 NT2.2 R12.1 R16.1 | length 3685.6
  Top Layer w5: v1(2185.04,885.83) 2185.04,700.79 2350.39,535.43 2350.39,279.53 v1(2318.9,248.03)
  MidLayer3 w5: v1(1468.5,248.03) 1484.25,248.03 1496.06,259.84 2291.34,259.84 2303.15,248.03 v1(2318.9,248.03)
  MidLayer4 w5: v2(2255.9,2665.35) 2255.9,2314.96 2311.02,2259.84 2311.02,1858.27 v1(2350.39,1818.9)
  Bottom Layer w5: NT2.2@1440.94,258.86 1457.68,258.86 v1(1468.5,248.03) ; R12.1@2185.04,925.2 R12.1@2186.54,925.2 ; v1@2186.54,885.83 R16.1@2186.54,984.25 2208.66,984.25 2251.96,1027.55 2251.96,1396.91 2259.78,1404.73 2259.78,1462.5 2301.34,1504.06 2301.34,1539.94 2256,1585.28 2256,1754.56 2265.54,1764.1 2362.62,1764.1 2374.02,1775.5 2374.02,1795.28 v1(2350.39,1818.9)
  Bottom Layer w7.87: HDR_T1.74@2255.91,2606.3 v2(2255.9,2665.35)
FPGA_ID0: HDR_T1.42 NT4.1
FPGA_ID1: HDR_T1.40 NT5.1
FPGA_ID2: HDR_T1.38 NT6.1
FPGA_ID3: HDR_T1.36 NT7.1
FPGA_INIT: HDR_T1.68 R9.1 U4.AC14 | length 3233.5
  Top Layer w7.87: U4.AC14@1543.31,1098.43 v1(1562.99,1078.74)
  MidLayer1 w5: v1(1523.62,779.53) 1551.18,807.09 1551.18,1019.69 1543.31,1027.56 1543.31,1059.05 v1(1562.99,1078.74)
  MidLayer4 w5: v2(2161.42,2688.98) 2161.42,2346.46 2291.34,2216.54 2291.34,1842.52 v1(2350.39,1783.46)
  Bottom Layer w5: v1(1523.62,779.53) 2047.24,779.53 2082.68,814.96 2082.68,984.25 2102.36,1003.94 2200.79,1003.94 2240.15,1043.3 2240.15,1399.24 2249.78,1408.87 2249.78,1466.64 2291.34,1508.2 2291.34,1535.8 2246,1581.14 2246,1758.7 2261.4,1774.1 2341.03,1774.1 v1(2350.39,1783.46) ; R9.1@2060.55,866.14 2082.68,866.14
  Bottom Layer w7.87: HDR_T1.68@2161.42,2606.3 v2(2161.42,2688.98)
FPGA_INSTALLED: HDR_T1.34 NT1.1 | length 55.2
  Bottom Layer w7.87: HDR_T1.34@1625.99,2606.3 NT1.1@1625.98,2661.42
FPGA_M0: HDR_T1.60 R14.1 | length 3208.1
  Bottom Layer w5: R14.1@864.64,881.89 822.84,881.89 814.96,889.76 814.96,1846.46 799.21,1862.2 799.21,2177.17 842.52,2220.47 1039.37,2220.47 1059.06,2240.16 1059.06,2681.1 1118.11,2740.16 1496.99,2740.16 1512.11,2755.28 1992.76,2755.28 2039.37,2708.66 2039.37,2677.17 2035.43,2673.23 HDR_T1.60@2035.43,2606.3
FPGA_M1: HDR_T1.58 R13.1 | length 3006.8
  Bottom Layer w5: R13.1@864.64,968.5 846.46,968.5 838.58,976.38 838.58,1854.33 822.83,1870.08 822.83,2169.29 850.39,2196.85 1055.12,2196.85 1082.68,2224.41 1082.68,2665.35 1133.86,2716.54 1501.66,2716.54 1520.4,2735.28 1961.57,2735.28 1992.13,2704.72 1992.13,2677.17 2003.94,2665.35 HDR_T1.58@2003.94,2606.3
FPGA_M2: HDR_T1.56 R11.1 | length 3148
  Top Layer w5: v2(1972.44,2692.91) v2(2015.75,2692.91)
  Bottom Layer w5: R11.1@864.64,925.2 832.88,925.2 826.77,931.3 826.77,1850.39 811.02,1866.14 811.02,2173.23 846.46,2208.66 1047.24,2208.66 1070.87,2232.28 1070.87,2673.23 1125.98,2728.35 1499.32,2728.35 1516.25,2745.28 1983.07,2745.28 2015.75,2712.6 v2(2015.75,2692.91) ; HDR_T1.56@1972.44,2606.3 v2@1972.44,2688.98
FPGA_PROG_CLK: HDR_T1.88
FPGA_PROG_PWR_ON: HDR_T1.86 R4.1 | length 2152.1
  Top Layer w5: v1(972.44,2177.17) 972.44,2200.79 v1(972.44,2240.16)
  Bottom Layer w5: R4.1@963.07,2145.66 964.57,2147.16 964.57,2169.29 v1(972.44,2177.17) ; v1(972.44,2240.16) 1007.87,2275.59 1007.87,2287.4 1023.62,2303.15 1023.62,2692.91 1106.3,2775.59 1490,2775.59 1499.68,2785.28 2246.22,2785.28 2318.9,2712.6 2417.32,2712.6 2444.88,2685.04 HDR_T1.86@2444.88,2606.3
FPGA_PROGRAM: HDR_T1.62 R3.1 R15.1 | length 1928
  Top Layer w5: v1(909.45,2177.17) 909.45,2212.6 960.63,2263.78 996.06,2263.78 1003.94,2255.91 v1(1003.94,2240.16)
  Bottom Layer w5: R15.1@887.32,2094.48 R3.1@887.32,2145.66 901.57,2145.66 909.45,2153.54 v1(909.45,2177.17) ; v1(1003.94,2240.16) 1039.37,2240.16 1047.24,2248.03 1047.24,2685.04 1114.17,2751.97 1494.66,2751.97 1507.97,2765.28 2002.44,2765.28 2066.93,2700.79 HDR_T1.62@2066.93,2606.3
FPGA_TCK: HDR_T1.72 R7.1 | length 717.6
  MidLayer3 w5: v1(2047.24,2157.48) 2047.24,2169.29 2059.06,2181.1 ; 2059.06,2181.1 2224.41,2346.45 v2(2224.41,2688.98)
  Bottom Layer w5: R7.1@2047.24,2127.48 v1(2047.24,2157.48)
  Bottom Layer w7.87: HDR_T1.72@2224.41,2606.3 v2(2224.41,2688.98)
FPGA_TDI: HDR_T1.78 R10.1 | length 2096.1
  Top Layer w5: v1(1027.56,2263.78) 1062.99,2228.35 v1(1062.99,2176.89)
  Bottom Layer w5: R10.1@1005.43,2094.48 1039.37,2094.48 1062.99,2118.11 v1(1062.99,2176.89) ; v1(1027.56,2263.78) 1027.56,2287.4 1035.43,2295.28 1035.43,2688.98 1110.24,2763.78 1492.33,2763.78 1503.83,2775.28 2236.54,2775.28 2318.9,2692.91 HDR_T1.78@2318.9,2606.3
FPGA_TDO: HDR_T1.54 R5.1 R8.1 | length 777.8
  MidLayer4 w5: v2(1940.94,2665.35) 1940.94,2377.95 2094.49,2224.41 v1(2094.49,2086.61)
  Bottom Layer w5: v1(2094.49,2086.61) 2095.99,2085.11 R5.1@2129.92,2085.11 R8.1@2129.92,2044.8
  Bottom Layer w7.87: HDR_T1.54@1940.95,2606.3 v2(1940.94,2665.35)
FPGA_TMS: HDR_T1.70 R6.1 | length 706.5
  MidLayer3 w5: v1(2000,2133.86) 2000,2169.29 2066.93,2236.22 2066.93,2251.97 2192.91,2377.95 v2(2192.91,2665.35)
  Bottom Layer w5: R6.1@1964.56,2135.35 1966.05,2133.86 1968.5,2133.86 v1(2000,2133.86)
  Bottom Layer w7.87: HDR_T1.70@2192.91,2606.3 v2(2192.91,2665.35)